# Altium PCB absenc-27.PcbDoc
Units mil, origin at the board's own origin, x right, y up, seen from the top; angles counter-clockwise.
Board outline 1500 x 1500 mil, 4 copper layers (Top Layer, GND, 3V3, Bottom Layer), stack 23.756 mil thick; 57 components, 37 nets, 202 pads, 49 vias.
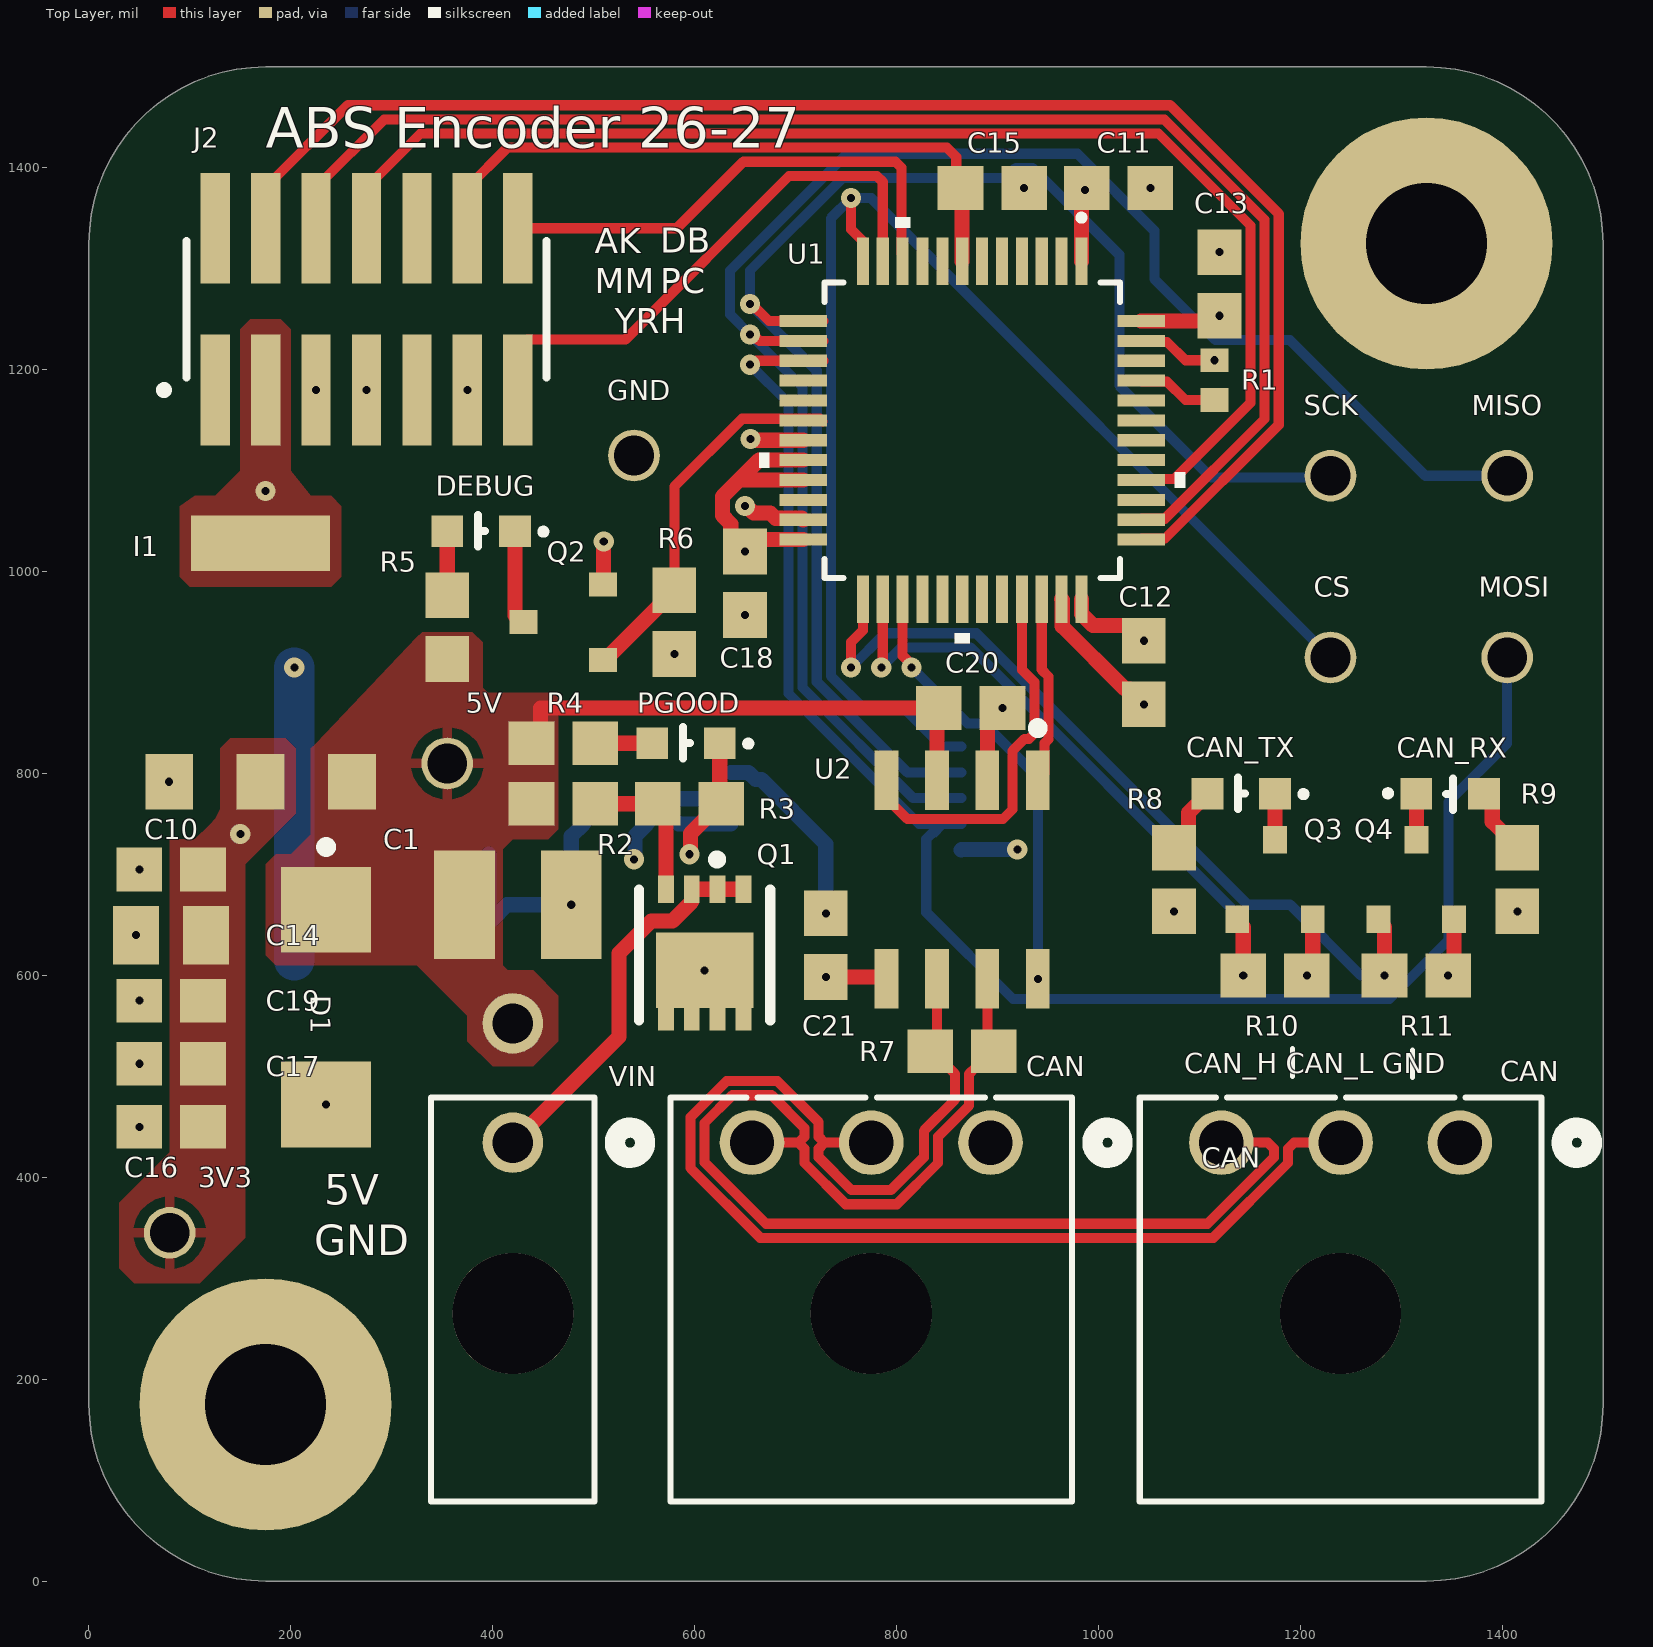
[diagram p0: Top Layer view]
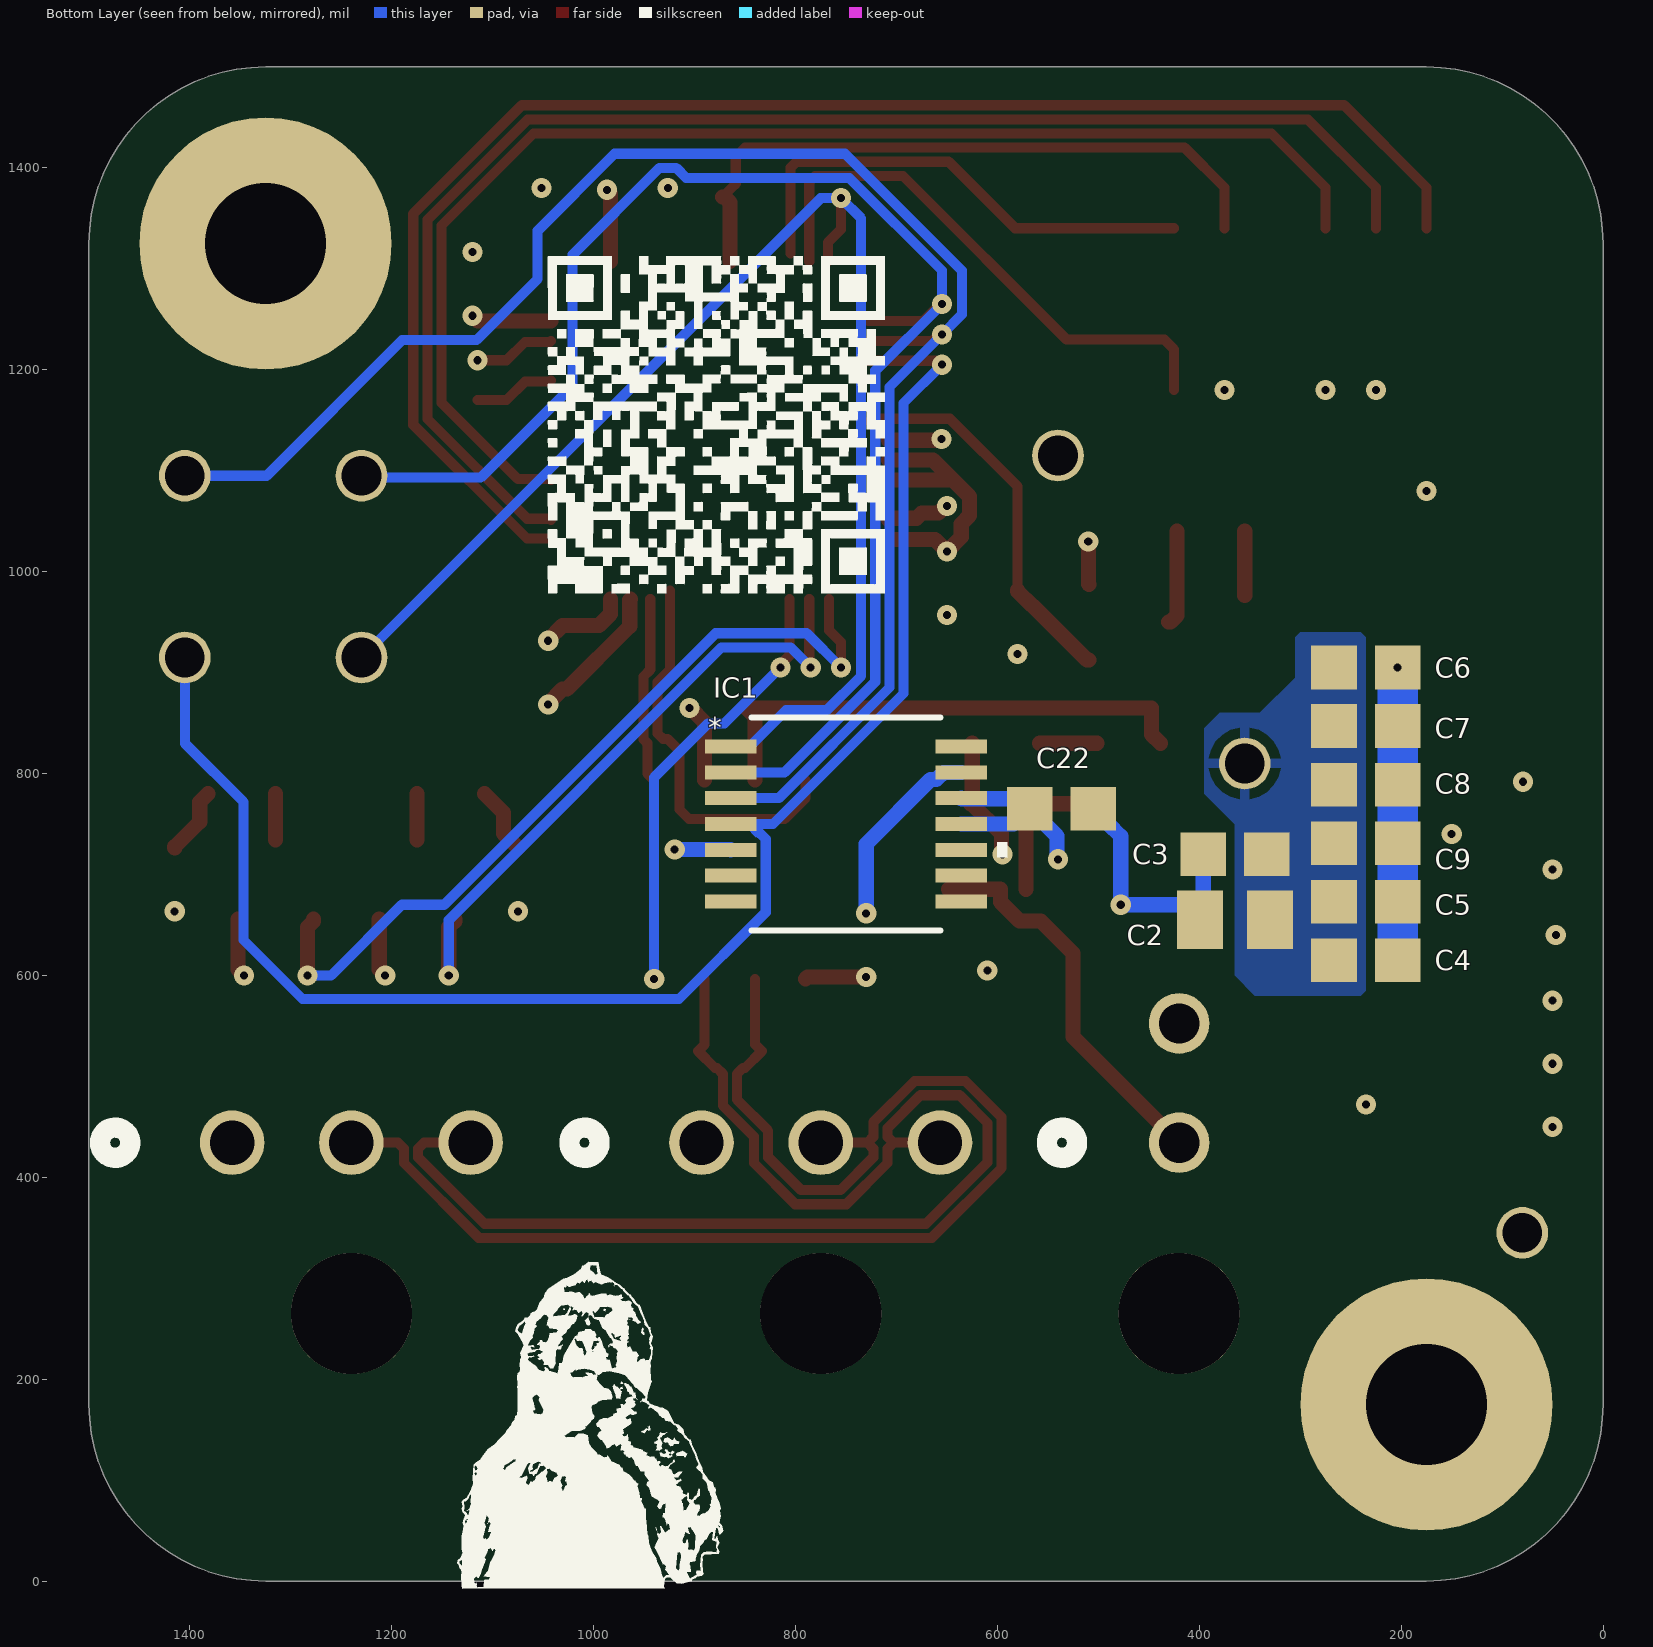
[diagram p1: Bottom Layer view, seen from below]
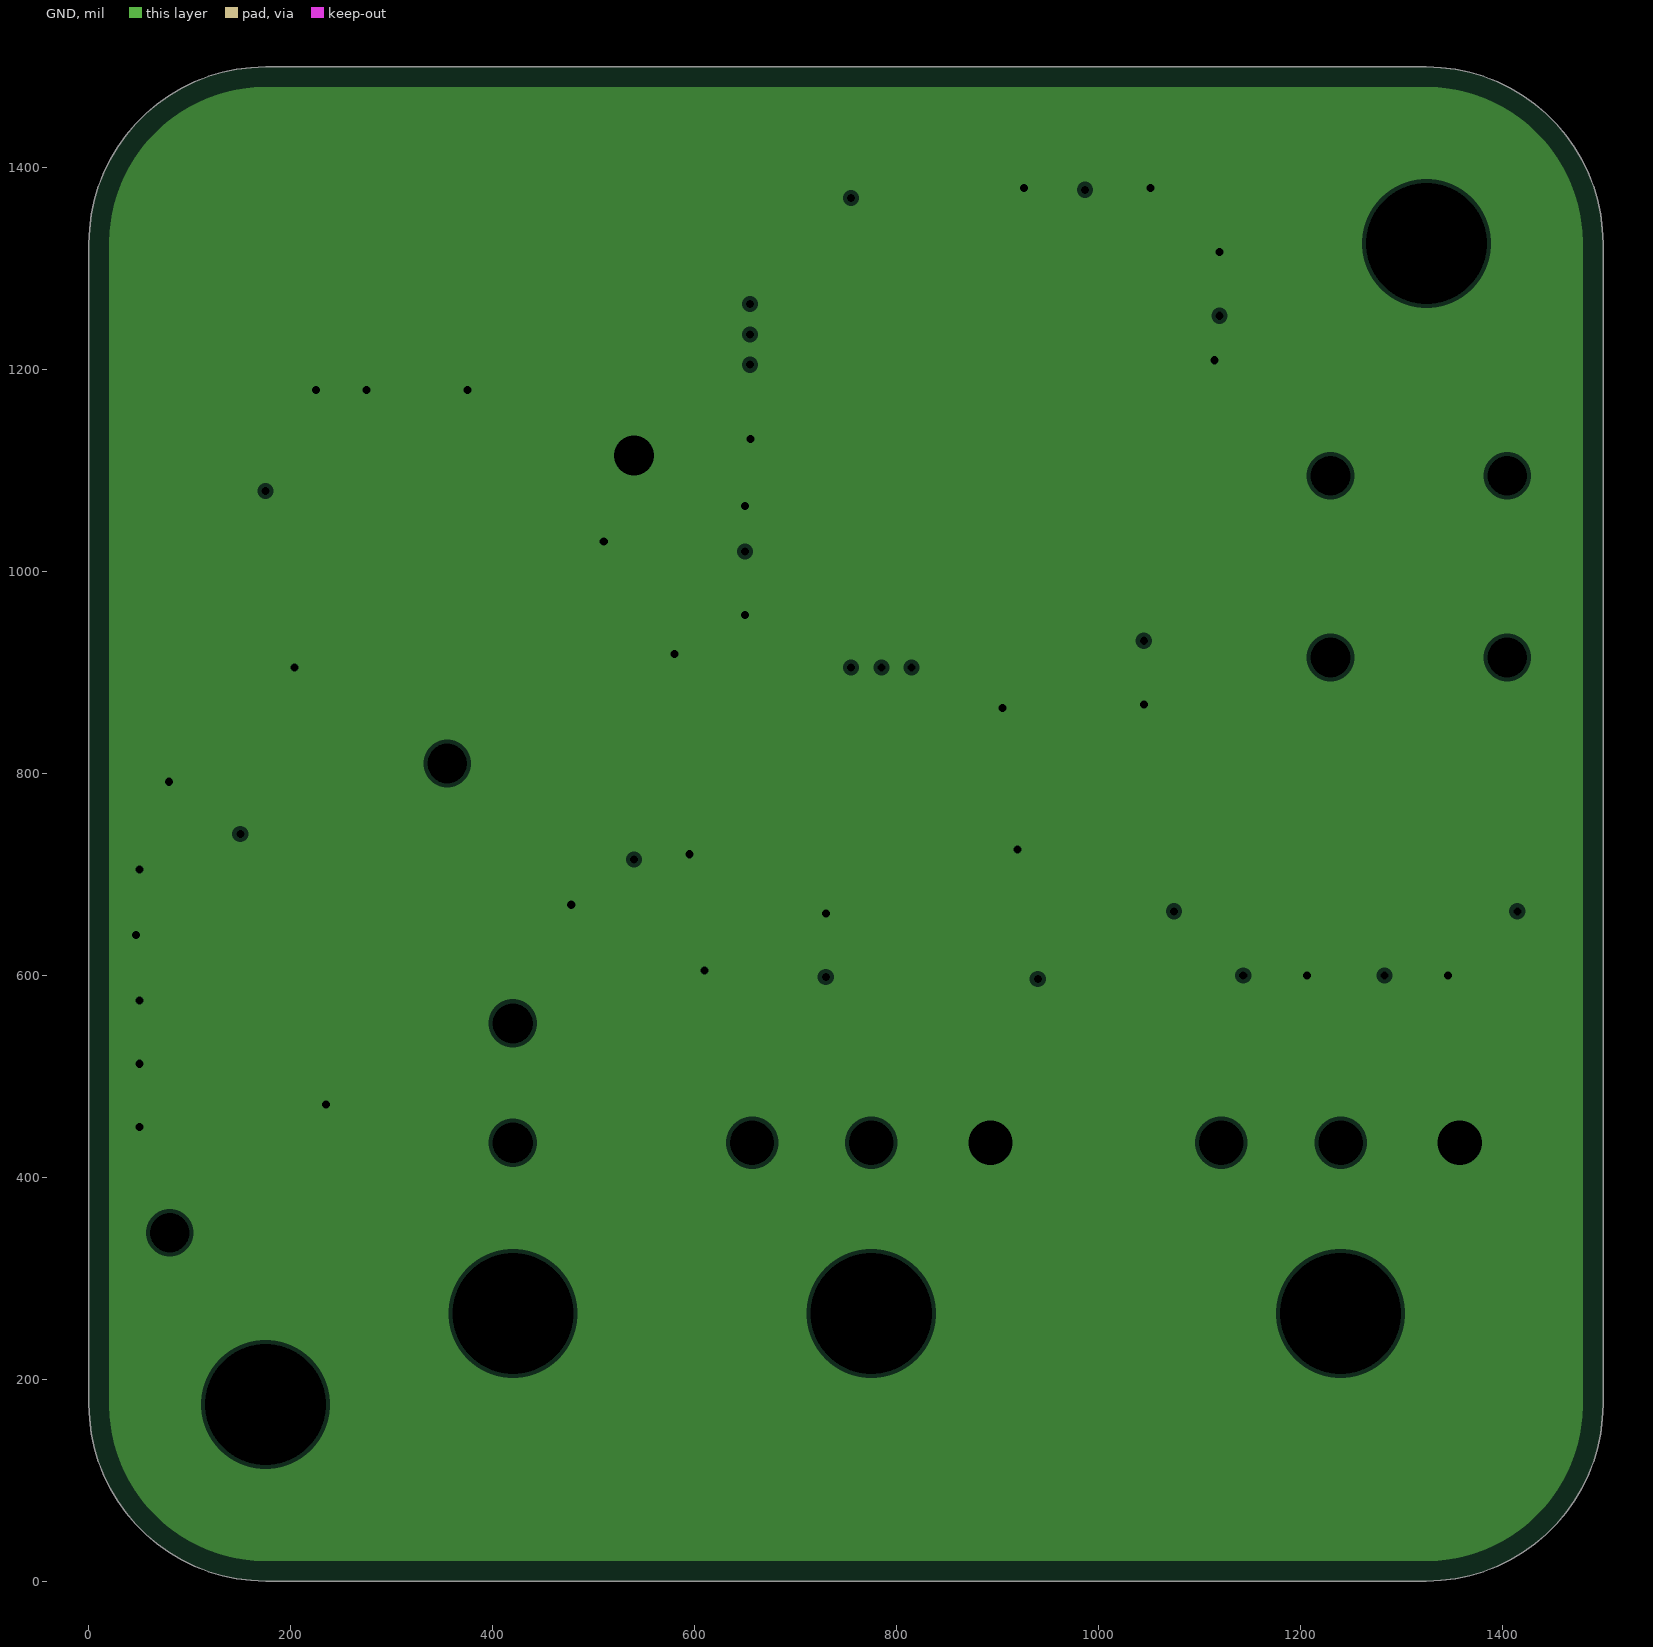
[diagram p2: GND, clearances drawn from the general rule]
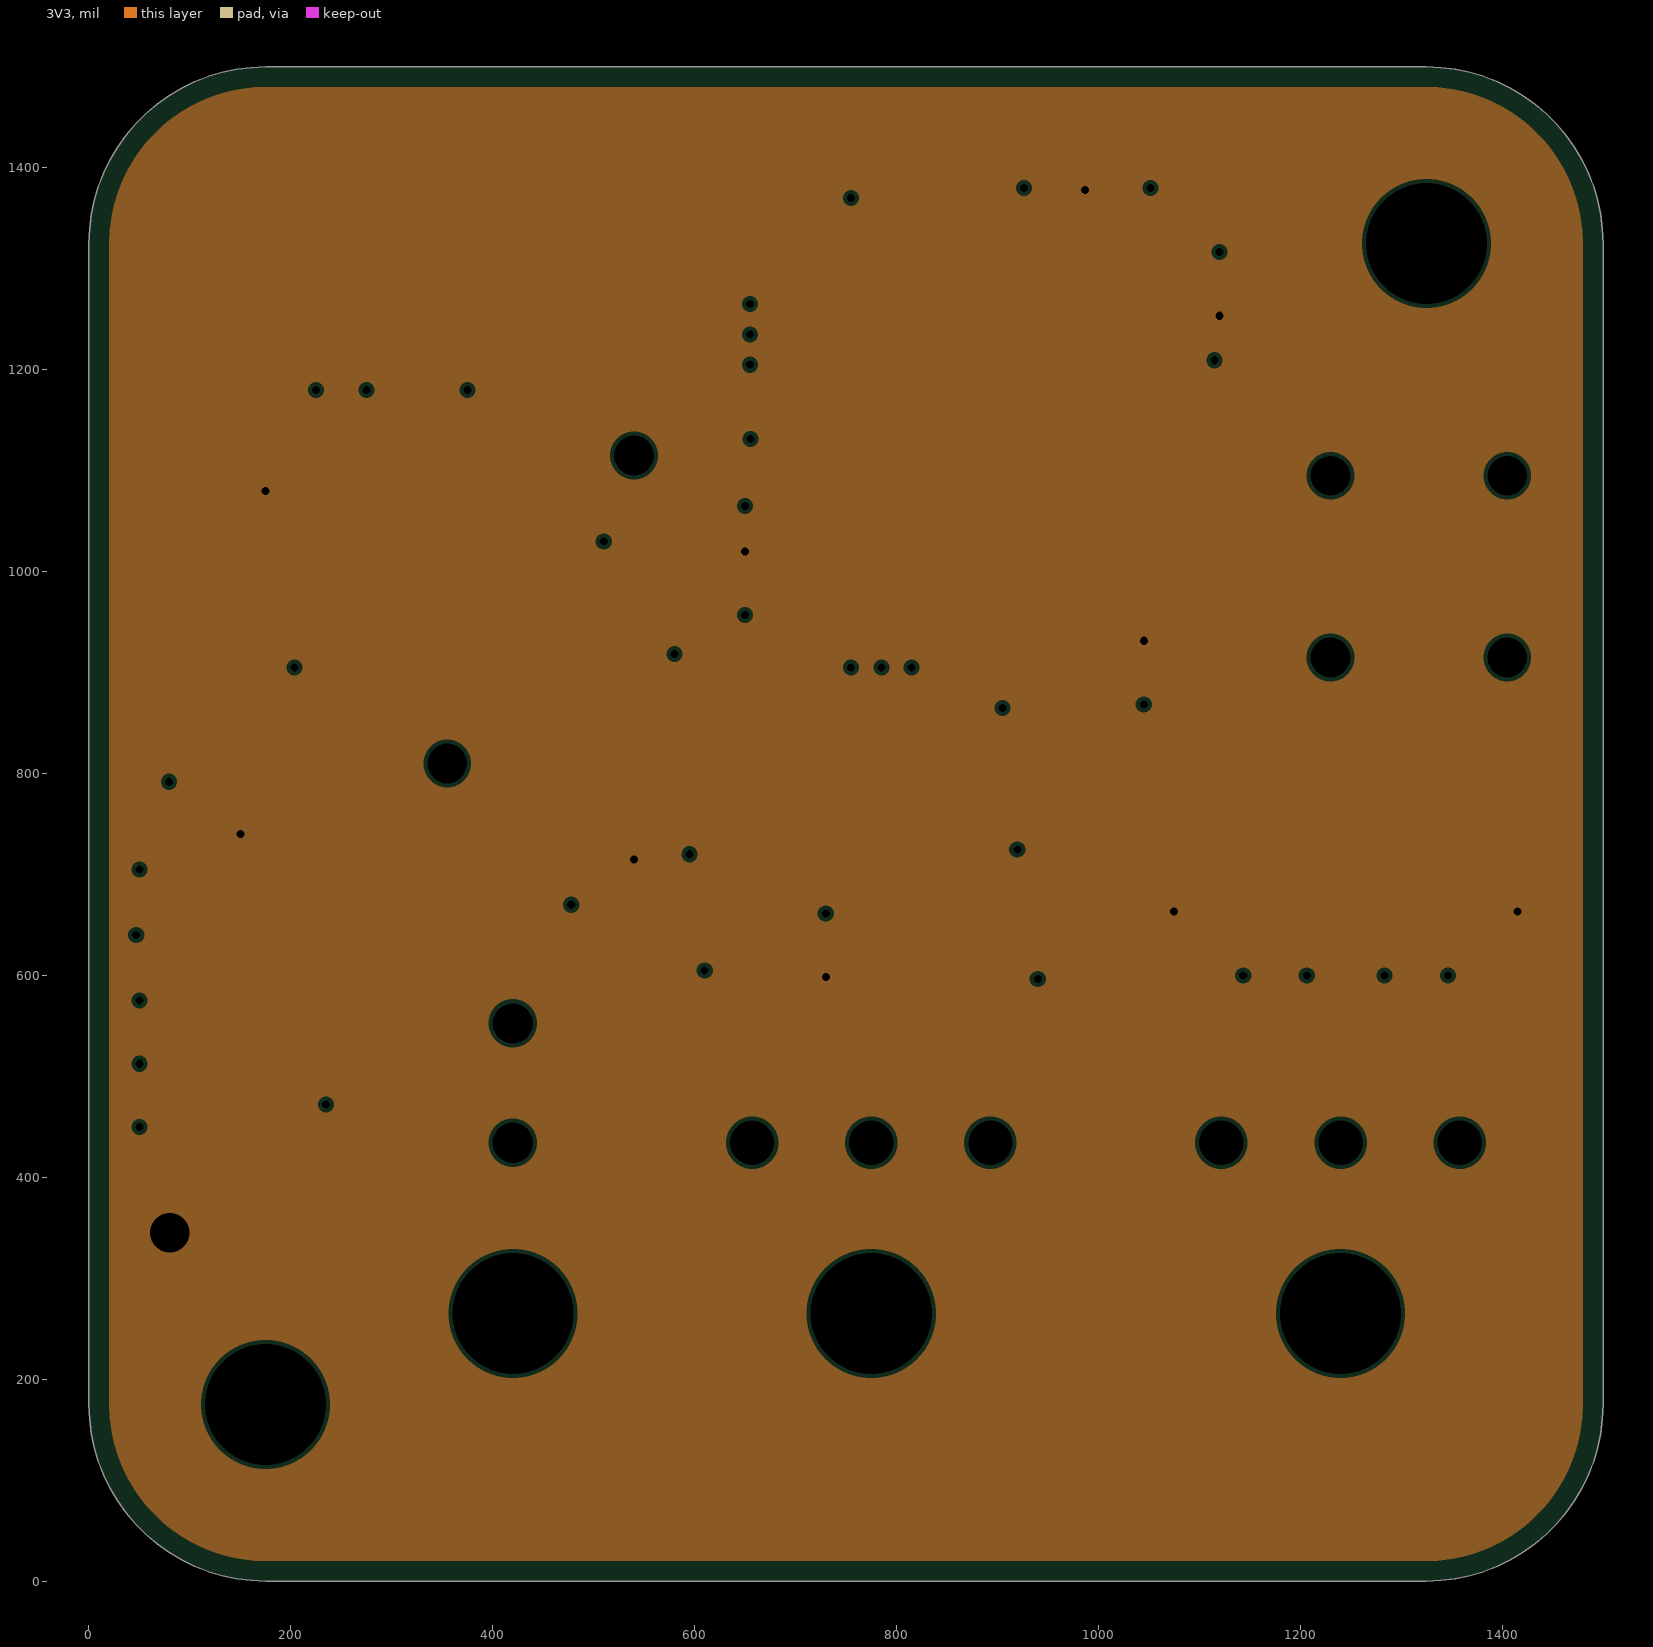
[diagram p3: 3V3, clearances drawn from the general rule]
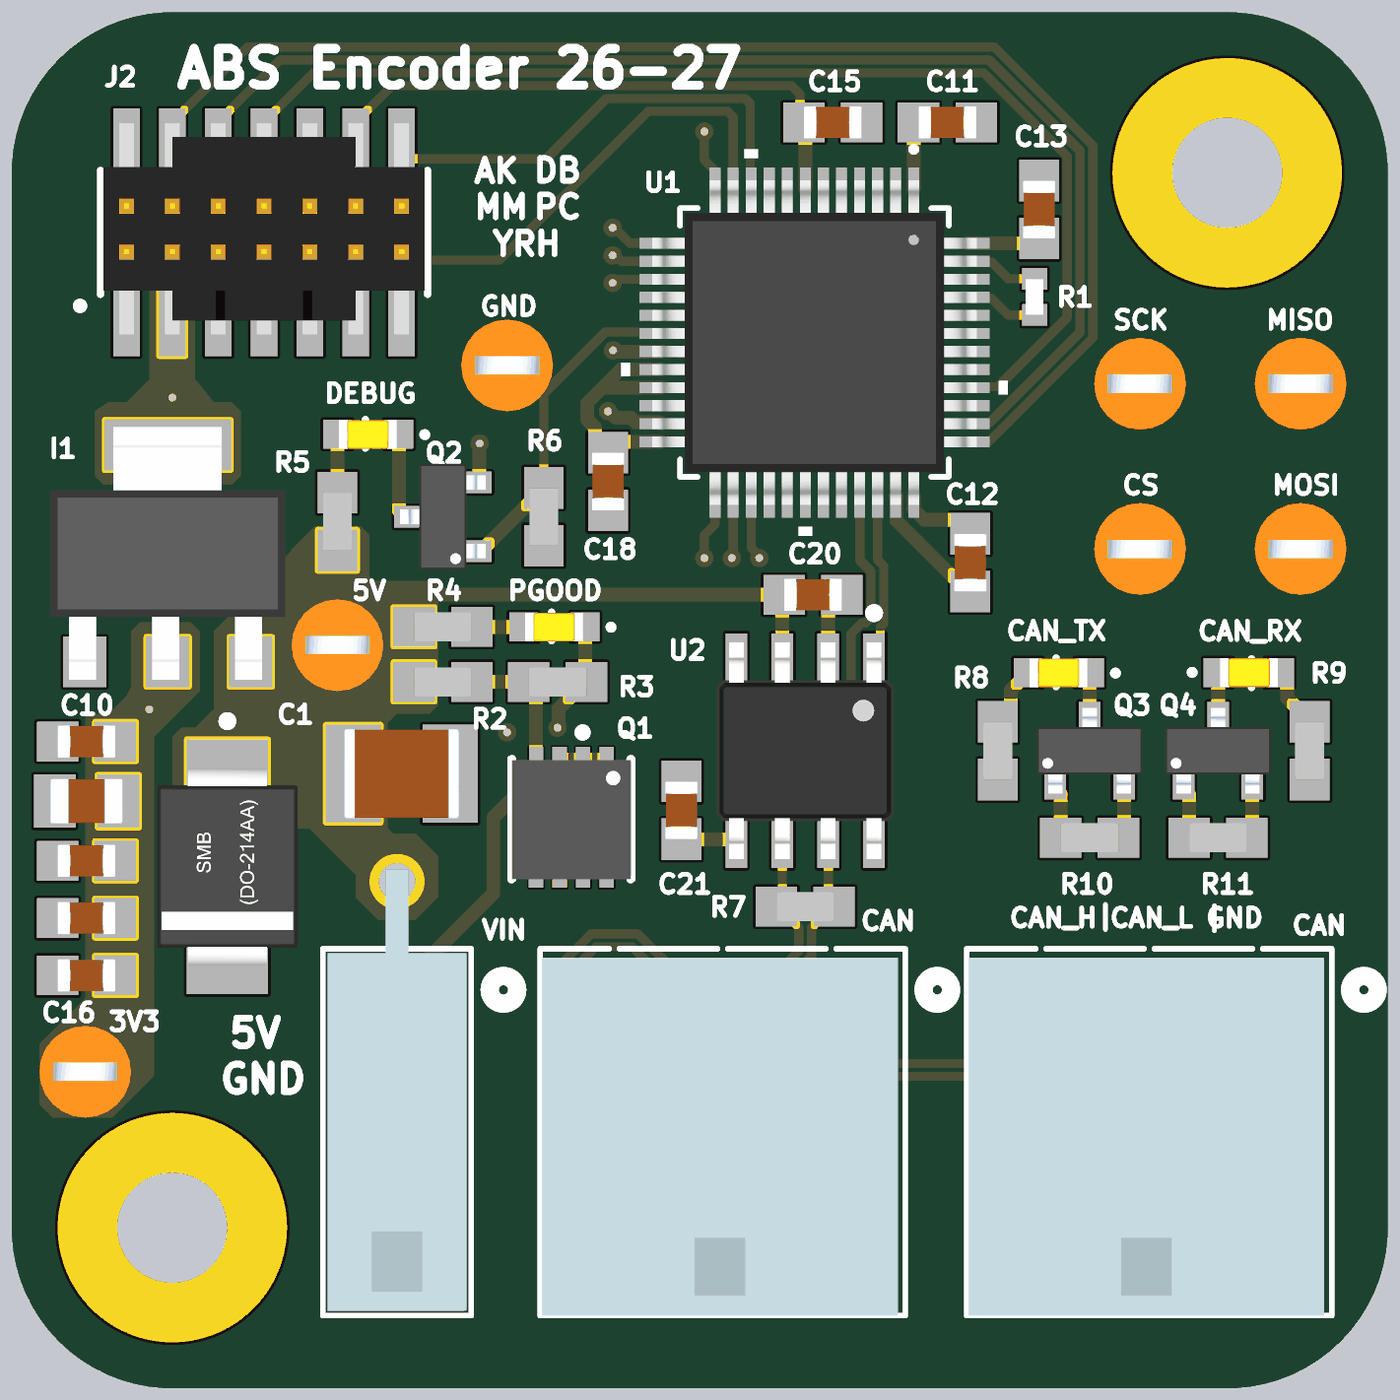
[diagram p4: 3D render of the assembled board from above, using the file's embedded part models]
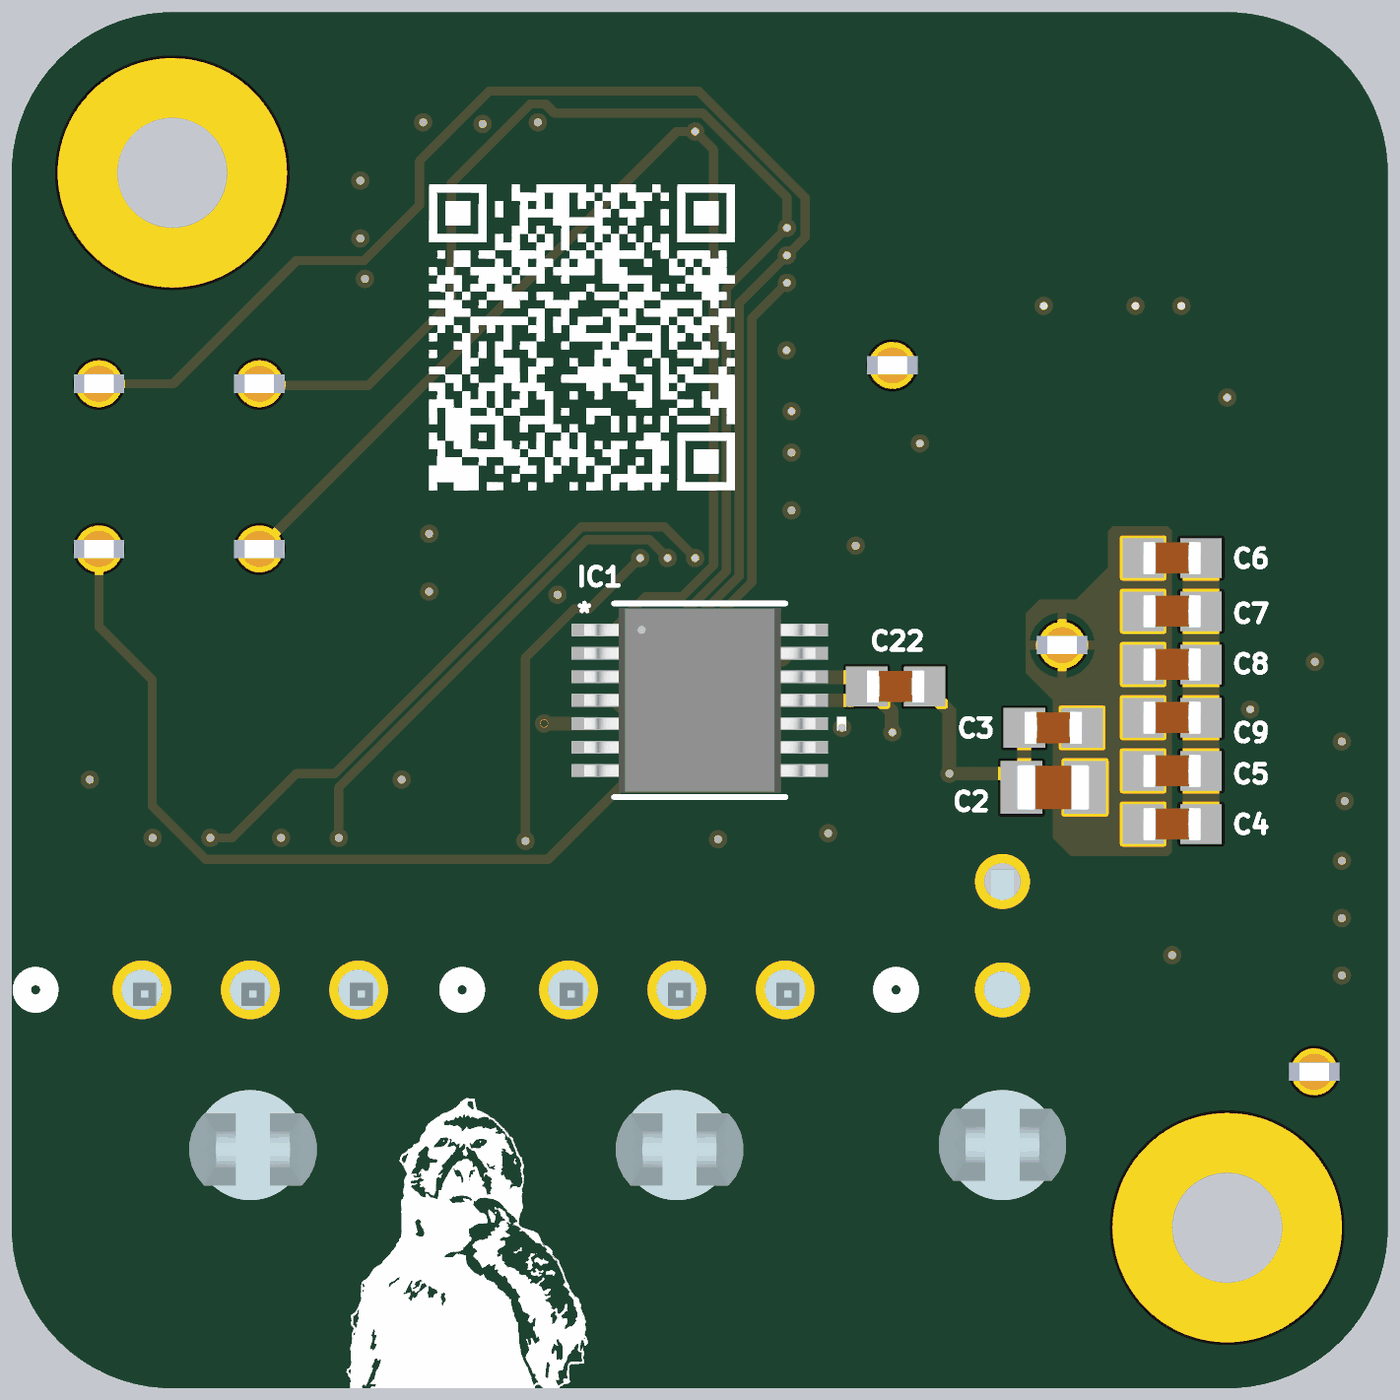
[diagram p5: 3D render of the assembled board from below, using the file's embedded part models]

## Layer stack, top to bottom
Top Solder: solder mask 0.4, Solder Resist, Dk 3.5
Top Layer: signal copper 1.4
Dielectric 2: prepreg 2.8, PP-006, Dk 4.1
GND: plane copper 1.378, net GND
Dielectric 1: dielectric 12.6, FR-4, Dk 4.8
3V3: plane copper 1.378, net 3V3
Dielectric 3: prepreg 2.8, PP-006, Dk 4.1
Bottom Layer: signal copper 1.4
Bottom Solder: solder mask 0.4, Solder Resist, Dk 3.5

## Board outline
0,175 0,1325 cw(c175,1325) 175,1500 1325,1500 cw(c1325,1325) 1500,1325 1500,175 cw(c1325,175) 1325,0 175,0 cw(c175,175)

## Design rules (kind name [scope] priority, off if disabled: settings)
BoardOutlineClearance [All] p1: gap=7.87 ignorepadtopadclearanceinfootprint=FALSE
Clearance [All] p1: gap=4 ignorepadtopadclearanceinfootprint=FALSE except(5: Arc-Via Track-Via SMDPad-Via THPad-Via Via-Via Via-Fill Via-Poly Via-Region Via-Text; 9.84: Arc-Hole Track-Hole SMDPad-Hole THPad-Hole Via-Hole Fill-Hole Poly-Hole Region-Hole Text-Hole)
ComponentClearance [All] p1: gap=4 collisioncheckmode=3 verticalgap=4 showdistances=TRUE
DiffPairsRouting [All] p1: maxlimit=4 minlimit=4 mostfreqgap=4 toplayer_minwidth=4 toplayer_maxwidth=71497.94 toplayer_prefwidth=4 bottomlayer_minwidth=4 bottomlayer_maxwidth=71497.94 bottomlayer_prefwidth=4 maxuncoupledlength=500
Height [All] p1: minheight=0 maxheight=71497.94 prefheight=500
HoleSize [All] p1: absolutevalues=TRUE maxlimit=248.03 minlimit=7.87 maxpercent=80.000 minpercent=20.000
HoleToHoleClearance [All] p1: gap=9.84 allowstackedmicrovias=FALSE
MinimumAnnularRing [All] p1: minimumring=3
MinimumSolderMaskSliver [All] p1: minsoldermaskwidth=0
PlaneClearance [All] p1: clearance=4
PlaneConnect PlaneConnectPowerPads [InPadClass('PowerPads')] p1: planeconnectstyle=Direct reliefexpansion=20 reliefentries=4 reliefconductorwidth=10 reliefairgap=10
PlaneConnect [All] p2: pad.planeconnectstyle=Relief pad.reliefexpansion=11.81 pad.reliefentries=4 pad.reliefconductorwidth=4 pad.reliefairgap=4 via.planeconnectstyle=Direct via.reliefexpansion=11.81 via.reliefentries=4 via.reliefconductorwidth=5 via.reliefairgap=5
PolygonConnect PolygonConnectPowerPads [All vs (InPadClass('PowerPads'))] p1: connectstyle=Direct reliefconductorwidth=10 reliefentries=4 polygonreliefangle="90 Angle" airgapwidth=10
PolygonConnect [All] p2: connectstyle=Direct reliefconductorwidth=4 reliefentries=4 polygonreliefangle="90 Angle" airgapwidth=4
RoutingVias [All] p1: holewidth=7.87 width=17.72 viastyle="Through Hole" minholewidth=7.87 minwidth=17.72 maxholewidth=248.03 maxwidth=257.87
SilkToSilkClearance [All] p1: silktosilkclearance=0
SilkToSolderMaskClearance [IsPad] p1: minsilkscreentomaskgap=4 clearancetoexposedcopper=TRUE
SolderMaskExpansion [All] p1: expansion=2.95 istentingtop=FALSE
SupplyNets "Schematic Supply Nets_3" [InNet('3V3')] p1: voltage=0.000
SupplyNets "Schematic Supply Nets_2" [InNet('GND')] p2: voltage=0.000
SupplyNets "Schematic Supply Nets" [InNet('5V')] p3: voltage=0.000
Width [All] p1: maxlimit=71497.94 minlimit=4 preferedwidth=4
20 further rules are at their usual default settings.

## Classes and differential pairs
component class MCU: C11 C12 C13 C14 C15 C16 C17 C18 C19 DEBUG J2 PGOOD Q2 R1 R4 R5 R6 U1
component class "Input Power": 3V3 5V C1 C2 C3 C4 C5 C6 C7 C8 C9 C10 D1 GND IC1 Q1 R2 R3 VIN
component class Encoder: C22 CS IC1 MISO MOSI SCK
component class CAN: C20 C21 CAN CAN_RX CAN_TX Q3 Q4 R7 R8 R9 R10 R11 U2
differential pair CAN: +CAN_H -CAN_L

## Components (designator, comment, footprint, x,y, rotation, side; value= is the part's Value field where it differs from the comment)
3V3 "5003" TEST-POINT-0001 80,345 r0 top
5V "5003" TEST-POINT-0001 355,810 r0 top
C1 "CAP 1210" CAP-1210 425,670 r0 top
C2 "CAP 0805" CAP-0805 364.65,655 r0 bottom
C3 "CAP 0603" CAP-0603 364.65,720 r0 bottom
C4 "CAP 0603" CAP-0603 235,615 r180 bottom
C5 "CAP 0603" CAP-0603 235,673 r180 bottom
C6 "CAP 0603" CAP-0603 235,905 r180 bottom
C7 "CAP 0603" CAP-0603 235,847 r180 bottom
C8 "CAP 0603" CAP-0603 235,789 r180 bottom
C9 "CAP 0603" CAP-0603 235,731 r180 bottom
C10 "CAP 0603" CAP-0603 81.5,705 r180 top
C11 "CC0603KRX7R0BB104" CAP-0603 1020,1380 r180 top
C12 "CC0603KRX7R0BB104" CAP-0603 1045,900 r90 top
C13 "CC0603KRX7R0BB104" CAP-0603 1120,1285 r270 top
C14 "CAP 0805" CAP-0805 81.5,640 r0 top
C15 "CAP 0603" CAP-0603 895,1380 r0 top
C16 "CAP 0603" CAP-0603 81.5,450 r0 top
C17 "CAP 0603" CAP-0603 81.5,512.5 r0 top
C18 "CC0603KRX7R0BB104" CAP-0603 650,988.5 r90 top
C19 "CAP 0603" CAP-0603 81.5,575 r0 top
C20 "CAP 0603" CAP-0603 873.5,865 r0 top
C21 "CAP 0603" CAP-0603 730,630 r90 top
C22 "CAP 0603" CAP-0603 536.5,765 r180 bottom
CAN "2157601003" CONN_2157600003-SD_03_PEG_MOL 1358.11,434.29 r0 top (schematic designator J4)
CAN "2157601003" CONN_2157600003-SD_03_PEG_MOL 893.11,434.29 r0 top (schematic designator J3)
CAN_RX "BL-HKC36G-AV-TRB" LED-0603 1291.81,750.42 r0 top (schematic designator D5)
CAN_TX "BL-HKC36G-AV-TRB" LED-0603 1198.19,809.58 r180 top (schematic designator D4)
CS "5003" TEST-POINT-0001 1230,915 r0 top
D1 "SMBJ40CA" "DO-214AA (SMBJ)" 235,567.2 r90 top
DEBUG "BL-HKC36G-AV-TRB" LED-0603 445.19,1069.58 r180 top (schematic designator D3)
GND "5003" TEST-POINT-0001 540,1115 r0 top
I1 "LM1117IMPX-3.3/NOPB" IC-SOT-223-4 170,910 r90 top
IC1 "AS5047D-ATSM" TSSOP14_AMS 750,750 r180 bottom
J2 "FTSH-107-01-L-DV-K" SAMTEC_FTSH-107-01-L-DV-K 275,1260 r0 top
MISO "5003" TEST-POINT-0001 1405,1095 r0 top
MOSI "5003" TEST-POINT-0001 1405,915 r0 top
PGOOD "BL-HKC36G-AV-TRB" LED-0603 648.2,859.58 r180 top (schematic designator D2)
Q1 "CSD18543Q3AT" IC-8VSONCLIP 682.32,719.84 r180 top
Q2 "T2N7002AK,LM" IC-SOT23-3 470,950 r90 top
Q3 "T2N7002AK,LM" IC-SOT23-3 1175,695 r0 top
Q4 "T2N7002AK,LM" IC-SOT23-3 1315,695 r0 top
R1 "RES 0402" RES-0402 1115,1189.68 r90 top
R2 "RES 0603" RES-0603 470,770 r0 top
R3 "RES 0603" RES-0603 595,770 r0 top
R4 "RES 0603" RES-0603 470,830 r0 top
R5 "RES 0603" RES-0603 355,945 r90 top
R6 "RES 0603" RES-0603 580,950 r90 top
R7 "RES 0603" RES-0603 865,525 r0 top
R8 "RES 0603" RES-0603 1075,695 r90 top
R9 "RES 0603" RES-0603 1415,695 r90 top
R10 "RES 0603" RES-0603 1175,600 r0 top
R11 "RES 0603" RES-0603 1315,600 r0 top
SCK "5003" TEST-POINT-0001 1230,1095 r0 top
U1 "STM32G431CBT6" IC-LQFP48 875,1140 r270 top
U2 "TCAN1044VDRQ1" IC-8SOIC 865,695 r180 top
VIN "2125280200" CONN_2125280000_02_MOL 420,434.29 r0 top (schematic designator J1)

## Footprints (in the part's own frame and the unit in brackets; to place one, negate y for a bottom-side part, rotate by r counter-clockwise, add the part's x,y. Pads: shape width x height; smd on the part's side, far side on the other; paste and mask are expansions set on the pad)
CAP-0603 [mm]
  rect 1.15x1.1 smd: 1(-0.8,0) 2(0.8,0)
  body extent -0.8,-0.45 0.8,0.45, height 0.8
CAP-0805 [mm]
  rect 1.16x1.47 smd: 1(-0.88,0) 2(0.88,0)
  body extent -1,-0.63 1,0.63, height 0.94
CAP-1210 [mm]
  rect 1.53x2.72 smd: 1(-1.341,0) 2(1.341,0)
  body extent -1.6,-1.25 1.6,1.25, height 2.7
CONN_2125280000_02_MOL [mil]
  round 60 hole 40 paste-99999 mask+0: 1(0,0) 2(0,118.11)
  round 120 hole 120 unplated paste-99999 mask+0: 3(0,-169.29)
  silkscreen extent -81,-355 131,45, body extent -76,-350 76,131, height 325
CONN_2157600003-SD_03_PEG_MOL [mil]
  round 64 hole 44 paste-99999 mask+0: 1(0,0) 2(-118.11,0) 3(-236.22,0)
  round 120 hole 120 unplated paste-99999 mask+0: 4(-118.11,-169.29)
  silkscreen extent -317,-355 131,45, body extent -315,-355 73,35, height 210
"DO-214AA (SMBJ)" [mm]
  rect 2.16x2.26 smd: 1(-2.416,0) 2(2.484,0)
  silkscreen extent 3.94,-0.13 4.19,0.12, body extent -2.72,-1.95 2.78,1.95, height 2.45
IC-8SOIC [mm]
  rect 0.6x1.5 smd: 1(-1.905,-2.5) 2(-0.635,-2.5) 3(0.635,-2.5) 4(1.905,-2.5) 5(1.905,2.5) 6(0.635,2.5) 7(-0.635,2.5) 8(-1.905,2.5)
  silkscreen extent -2.03,-3.93 -1.78,-3.69, body extent -2.45,-3 2.45,3, height 1.75
IC-8VSONCLIP [mm]
  rect 0.4x0.7 smd paste-100 mask+0.05: 1(2.812,0.877) 2(0.862,0.877) 2(1.512,0.877) 2(2.162,0.877) 3(0.862,4.077) 3(1.512,4.077) 3(2.162,4.077) 3(2.812,4.077)
  rect 2.45x1.9 smd paste-100 mask+0.05: 3(1.837,2.917)
  silkscreen extent 0.19,0.03 3.49,4.18, body extent 0.18,0.89 3.48,4.19, height 1.1
IC-LQFP48 [mil]
  rect 47x12 smd paste+0 mask+0: 1(-167.32,108.27) 2(-167.32,88.58) 3(-167.32,68.9) 4(-167.32,49.21) 5(-167.32,29.53) 6(-167.32,9.84) 7(-167.32,-9.84) 8(-167.32,-29.53) 9(-167.32,-49.21) 10(-167.32,-68.9) 11(-167.32,-88.58) 12(-167.32,-108.27) 25(167.32,-108.27) 26(167.32,-88.58) 27(167.32,-68.9) 28(167.32,-49.21) 29(167.32,-29.53) 30(167.32,-9.84) 31(167.32,9.84) 32(167.32,29.53) 33(167.32,49.21) 34(167.32,68.9) 35(167.32,88.58) 36(167.32,108.27)
  rect 12x47 smd paste+0 mask+0: 13(-108.27,-167.32) 14(-88.58,-167.32) 15(-68.9,-167.32) 16(-49.21,-167.32) 17(-29.53,-167.32) 18(-9.84,-167.32) 19(9.84,-167.32) 20(29.53,-167.32) 21(49.21,-167.32) 22(68.9,-167.32) 23(88.58,-167.32) 24(108.27,-167.32) 37(108.27,167.32) 38(88.58,167.32) 39(68.9,167.32) 40(49.21,167.32) 41(29.53,167.32) 42(9.84,167.32) 43(-9.84,167.32) 44(-29.53,167.32) 45(-49.21,167.32) 46(-68.9,167.32) 47(-88.58,167.32) 48(-108.27,167.32)
  silkscreen extent -214,-211 211,211, body extent -177,-177 177,177, height 63
IC-SOT23-3 [mm]
  rect 0.6x0.7 smd: 1(-0.95,-1) 2(0.95,-1) 3(0,1)
  body extent -1.46,-1.18 1.46,1.19, height 1.12
IC-SOT-223-4 [mm]
  rect 1.4x1.2 smd mask+0.07: 1(-3,2.3) 3(-3,-2.3) 4(-3,0)
  rect 1.4x3.5 smd: 2(3,0)
  body extent -3.5,-3.25 3.5,3.25, height 1.68
LED-0603 [mm]
  rect 0.8x0.8 smd: 1(2.291,0.751) 2(0.589,0.751)
  silkscreen extent -0.2,0.34 1.52,1.13, body extent 0.65,0.36 2.25,1.16, height 0.39
RES-0402 [mm]
  rect 0.6x0.7 smd: 1(-0.5,0) 2(0.5,0)
  body extent -0.5,-0.25 0.5,0.25, height 0.3
RES-0603 [mm]
  rect 1.15x1.1 smd: 1(-0.8,0) 2(0.8,0)
  body extent -0.8,-0.4 0.8,0.4, height 0.43
SAMTEC_FTSH-107-01-L-DV-K [mm]
  rect 0.74x2.79 smd: 01(-3.81,-2.035) 02(-3.81,2.035) 03(-2.54,-2.035) 04(-2.54,2.035) 05(-1.27,-2.035) 06(-1.27,2.035) 07(0,-2.035) 08(0,2.035) 09(1.27,-2.035) 10(1.27,2.035) 11(2.54,-2.035) 12(2.54,2.035) 13(3.81,-2.035) 14(3.81,2.035)
  silkscreen extent -5.19,-2.13 4.53,1.72, body extent -4.44,-2.82 4.44,3.02, height 5.96
TEST-POINT-0001 [mm] "2024 miniature test point"
  round 1.3 hole 1: 1(0,0)
  body extent -1.27,-1.27 1.27,1.27, height 4.57
TSSOP14_AMS [mm]
  rect 1.302x0.355 smd paste+0 mask+0: 1(-2.899,1.95) 2(-2.899,1.3) 3(-2.899,0.65) 4(-2.899,0) 5(-2.899,-0.65) 6(-2.899,-1.3) 7(-2.899,-1.95) 8(2.899,-1.95) 9(2.899,-1.3) 10(2.899,-0.65) 11(2.899,0) 12(2.899,0.65) 13(2.899,1.3) 14(2.899,1.95)
  silkscreen extent -2.37,-2.68 4.06,2.68, body extent -3.2,-2.55 3.2,2.55, height 1.2

## Part data
3V3 5V CS GND MISO MOSI SCK: library part TEST-POINT-0001, "Oranange PC Test Point, Miniature Phoisphor Bronze Silver Plating Through Hole Mounting Type"
C1: Capacitance=100uF, Voltage Rating=16V
C2: Capacitance=10uF, Voltage Rating=50V
C3: Capacitance="1.0 uF", Voltage Rating=50V
C4: Capacitance="100 nF", Voltage Rating=50V
C5 C16: Capacitance="10 nF", Voltage Rating="50 V"
C6: Capacitance="1.0 nF", Voltage Rating=50V
C7: Capacitance="100 pF", Voltage Rating=50V
C8: Capacitance="10 pF", Voltage Rating=50V
C9 C10: Capacitance="10 uF", Voltage Rating=16V
C11 C12 C13 C18: library part CAP-100N-0001, "CAP CER 0.1UF 100V X7R 0603", Capacitance="100 nF", Voltage="100 V", ComponentLink1Description=Datasheet, ComponentLink1URL=https://www.yageo.com/upload/media/product/app/datasheet/mlcc/upy-np0x7r_mv_100-to-630v.pdf, Device Class=Ceramic, Size=0603
C14: Capacitance="4.7 uF", Voltage Rating="50 V"
C15: Capacitance="100 nF", Voltage Rating="100 V"
C17 C19: Capacitance="1.0 uF", Voltage Rating="50 V"
C20 C21: Capacitance="100 nF", Voltage Rating=16V
C22: Capacitance=100nF, Voltage Rating=16V
CAN CAN: library part "CONN MF+ 3 PIN Right Angle", "Micro-Fit+ Right-Angle Header, Through Hole, 3.00mm Pitch, Single Row, 3  Circuits, Matte Tin (Sn) Plating, Glow-Wire Capable, Black", Manufacturer_Name=Molex, Copyright="Copyright (C) 2026 Ultra Librarian. All rights reserved.", Datasheet=https://www.molex.com/en-us/products/part-detail-pdf/2157601003?display=pdf, Manufacturer_Part_Number=2157601003, RefDes=RefDes, Type=Type
CAN_RX CAN_TX DEBUG PGOOD: library part LED-0001, "LED YELLOW CLEAR 0603 SMD", Forward Current=30mA, Forward Voltage=2V, ComponentLink1Description=Datasheet, ComponentLink1URL=https://www.americanbrightled.com/pdffiles/led-components/smt/BL-HKC36G-AV-TRB.pdf
D1: library part DIO-TVS-0001, "TVS DIODE 40VWM 64.5VC DO214AA", Current Rating=9.3A, Voltage Rating=64.5V, ComponentLink1Description=Datasheet, ComponentLink1URL=https://www.littelfuse.com/media?resourcetype=datasheets&itemid=09a6ae9a-73cb-4ac4-acac-e6dab92ab953&filename=littelfuse_tvs_diode_smbj_datasheet.pdf
I1: library part IC_LDO_3V3_0001, "IC REG LIN 3.3V 800MA SOT223-4", ComponentLink1Description="New link", ComponentLink1URL=https://www.ti.com/lit/ds/symlink/lm1117.pdf?HQS=dis-dk-null-digikeymode-dsf-pf-null-wwe&ts=1721700739746
IC1: "Description", Manufacturer_Name="ams OSRAM", Copyright="Copyright (C) 2026 Ultra Librarian. All rights reserved.", Manufacturer_Part_Number=AS5047D-ATSM, RefDes=RefDes, Type=Type
J2: library part CONN_Flashing-0001, "Connector Header Surface Mount 14 position 0.050\" (1.27mm)", Package=None, Availability=Unavailable, ComponentLink1Description=Datasheet, ComponentLink1URL=https://mm.digikey.com/Volume0/opasdata/d220001/medias/docus/6209/ftsh-1xx-xx-xxx-dv-xxx-xxx-x-xx-mkt.pdf, MF=Samtec, MP=FTSH-107-01-L-DV-K, Price=None
Q1: library part NMOS-60A-0001, "MOSFET N-CH 60V 12A/60A 8VSON", Continuous Current=60A, Voltage=60V, ComponentLink2Description=Datasheet, ComponentLink2URL=http://www.ti.com/lit/ds/symlink/csd18543q3a.pdf
Q2 Q3 Q4: library part NMOS-200MA-0001, "MOSFET N-CH 60V 200MA SOT23", Continuous Current=200mA, Voltage=60V, ComponentLink1Description=Datasheet, ComponentLink1URL=https://toshiba.semicon-storage.com/info/T2N7002AK_datasheet_en_20150401.pdf?did=29712&prodName=T2N7002AK
R1: Resistance=0Ω, Wattage=62.5mW
R2 R3: Resistance="150k Ω", Wattage=100mW
R4 R5 R6: Resistance="1kOhm +/-1%", Wattage=1/10W
R7: Resistance=120Ω, Wattage=1/2W
R8 R9: Resistance=100Ω, Wattage=1/16W
R10 R11: Resistance=80.6Ω, Wattage=1/16W
U1: library part IC-STM32G431CBT6, "IC MCU 32BIT 128KB FLASH 48LQFP", Package=48LQFP, ComponentLink1Description=Datasheet, ComponentLink1URL=https://www.st.com/resource/en/datasheet/stm32g431cb.pdf
U2: library part IC-CAN-0001, "IC TRANSCEIVER 1/1 8SOIC", ComponentLink1Description=Datasheet, ComponentLink1URL=https://www.ti.com/lit/ds/symlink/tcan1044-q1.pdf?HQS=dis-dk-null-digikeymode-dsf-pf-null-wwe&ts=1728758303289&ref_url=https%253A%252F%252Fwww.ti.com%252Fgeneral%252Fdocs%252Fsuppproductinfo.tsp%253FdistId%253D10%2526gotoUrl%253Dhttps%253A%252F%252Fwww.ti.com%252Flit%252Fgpn%252Ftcan1044-q1
VIN: library part "CONN MF+ 2 PIN Stacked Right Angle", "Micro-Fit+ Right-Angle Header, Through Hole, 3.00mm Pitch, Dual Row, 2 Circuits, 1.52Âµm Matte Tin (Sn) Plating, Glow-Wire Capable, Black", Manufacturer_Name=Molex, Copyright="Copyright (C) 2026 Ultra Librarian. All rights reserved.", Datasheet=https://www.molex.com/en-us/products/part-detail-pdf/2125280200?display=pdf, Manufacturer_Part_Number=2125280200, RefDes=RefDes, Type=Type

## Free pads (board coordinates)
  round 250 hole 120: ""(175,175) ""(1325,1325)

## Via types
v1: diameter 20, hole 8, Top Layer to Bottom Layer, tented both sides, 49 vias

## Nets (pads, with @x,y where several pads share a name; then routed paths per layer and width w, separated by ;. In a path a pad name is that pad's centre, name@x,y a point inside that pad or via, vN(x,y) a via of type N, cw(c..) or ccw(c..) an arc to the next point about the centre after c; other vN are vias at no path point)
3V3: 3V3.1 C10.1 C11.2 C12.2 C13.2 C14.2 C16.2 C17.2 C18.2 C19.2 C21.1 C22.1 I1.2 I1.4 IC1.11 IC1.12 J2.03 R8.1 R9.1 U1.1 U1.20 U1.21 U1.24 U1.36 U1.48 U2.5 | length 795.9
  Top Layer w15: U1.24 661.73,1031.73 v1(650,1020) 635.85,1034.15 635.85,1047.33 627.5,1055.68 627.5,1074.32 643.97,1090.79 ; U1.21 643.97,1090.79 ; U1.20 663.65,1110.47 643.97,1090.79 ; v1(730,598.5) 788.07,598.5 U2.5 ; U1.36 983.27,958.18 994.81,946.63 1030.85,946.63 1045,932.48 v1(1045,931.5) ; U1.1 983.27,1374.76 v1(986.74,1378.23) C11.2 ; U1.48 1114.76,1248.27 v1(1120,1253.5)
  Bottom Layer w15: v1(540,715) 540.96,715.96 540.96,737.96 552.85,749.86 552.85,750.85 567.01,765 C22.1 578.07,775.07 635.34,775.07 IC1.12 ; C22.1@568.98,765 583.98,750 IC1.11
  other v1: 1075,663.5 1415,663.5 150,740 175,1080
5V: 5V.1 C1.1 C2.1 C3.1 C4.1 C5.1 C6.1 C7.1 C8.1 C9.1 C20.1 D1.2 I1.3 R2.1 R4.1 R5.1 U2.3 VIN.2 | length 515
  Top Layer w15: R4.1 447.29,838.79 447.29,865 848.5,865 840,856.5 U2.3
A: IC1.7
B: IC1.6
"CAN RX LED": Q4.1 R11.1 U1.25 | length 813.6
  Top Layer w10: v1(755,905) 755,930 766.73,941.73 U1.25
  Top Layer w15: Q4.1 1277.6,653.66 1283.5,647.76 v1(1283.5,600)
  Bottom Layer w10: v1(755,905) 789,939 879.08,939 1148.08,670 1190,670 1260,600 v1(1283.5,600)
"CAN TX LED": Q3.1 R10.1 U1.26 | length 660.1
  Top Layer w10: v1(785,905) 785.41,905 786.42,906.01 U1.26
  Top Layer w15: Q3.1 1137.6,653.66 1143.5,647.76 v1(1143.5,600)
  Bottom Layer w10: v1(785,905) 805,925 873.28,925 1143.5,654.78 v1(1143.5,600)
CAN_H: CAN.3 R7.2 U2.7 | length 1303.4
  Top Layer w10: CAN.3@656.89,434.29 703.09,434.29 ; U2.7 890,531.5 R7.2 879.84,508.35 877.86,508.35 872,502.49 872,471.16 841.08,440.25 841.08,414.11 800.27,373.29 749.73,373.29 708.94,414.08 708.94,428.43 703.09,434.29 ; CAN.3@1121.89,434.29 1168.09,434.29 1173.94,428.43 1173.94,419.88 1108.07,354 670.71,354 609.89,414.82 609.89,453.76 637.42,481.29 676.36,481.29 708.94,448.7 708.94,440.15 703.09,434.29
CAN_L: CAN.2 R7.1 U2.6 | length 1349.7
  Top Layer w10: CAN.2@775,434.29 728.8,434.29 ; U2.6 840,531.5 R7.1 850.16,508.35 852.14,508.35 858,502.49 858,476.96 827.08,446.05 827.08,419.91 794.47,387.29 755.53,387.29 722.94,419.88 722.94,428.43 728.8,434.29 ; CAN.2@1240,434.29 1193.8,434.29 1187.94,428.43 1187.94,414.08 1113.87,340 664.91,340 595.89,409.02 595.89,459.56 631.62,495.29 682.16,495.29 722.94,454.5 722.94,440.15 728.8,434.29
CAN_RX: U1.33 U2.4 | length 389
  Top Layer w10: U2.4 790,775.71 810.81,754.9 905.54,754.9 915,764.36 915,822.49 926.85,834.35 931.37,834.35 936.64,839.62 936.64,890.38 924.46,902.56 U1.33@924.46,981.49
CAN_STB: U1.27 U2.8 | length 441.1
  Top Layer w10: U1.27 806.1,916.6 815,907.71 v1(815,905)
  Bottom Layer w10: v1(815,905) 870.33,849.67 886.59,849.67 940,796.26 v1(940,596.57)
CAN_TX: U1.34 U2.1 | length 186.5
  Top Layer w10: U2.1 946.81,800.24 946.81,829.99 950.64,833.82 950.64,896.18 943.9,902.92 U1.34
DEBUG: Q2.1 R6.2 U1.18 | length 377.1
  Top Layer w10: R6.2@580,982.48 580,1084.26 647.16,1151.42 724.1,1151.42 U1.18@726.68,1148.84
  Top Layer w15: Q2.1 511.34,912.6 565.1,966.36 565.85,966.36 580,980.51 R6.2
GND: C1.2 C2.2 C3.2 C4.2 C5.2 C6.2 C7.2 C8.2 C9.2 C10.2 C11.1 C12.1 C13.1 C14.1 C15.2 C16.1 C17.1 C18.1 C19.1 C20.2 C21.2 C22.2 CAN.1 D1.1 GND.1 I1.1 IC1.5 IC1.13 J2.05 J2.07 J2.11 PGOOD.2 Q1.3 Q2.2 Q3.2 Q4.2 R1.2 R3.2 R6.1 R10.2 R11.2 U1.19 U1.23 U1.35 U1.47 U2.2 | length 1494.5
  Top Layer w10: U1.47 1043.32,1227.58 1068.01,1227.58 1086.22,1209.37 v1(1115,1209.37)
  Top Layer w15: Q2.2 509.69,987.72 509.69,1029.69 v1(510,1030) ; v1(595,720) 595.96,720.96 595.96,740.44 625.51,770 R3.2 625,771.5 PGOOD.2 ; v1(650,1065) 651.35,1065 658.27,1058.09 674.93,1058.09 680.1,1052.92 706.18,1052.92 U1.23 ; v1(655.44,1131.42) 656.79,1131.42 658.06,1130.16 U1.19 ; U2.2 890,850.85 904.15,865 v1(905,865) ; U1.35 964.27,971.99 964.27,945.91 1026.54,883.64 1030.85,883.64 1045,869.49 v1(1045,868.5) ; v1(1206.49,600) 1212.4,605.91 Q3.2 ; v1(1346.49,600) 1352.4,605.91 Q4.2
  Bottom Layer w15: C3.2 396.14,658.15 C2.2 414.29,670 v1(477.8,670) 477.8,737.8 489.86,749.86 489.86,750.85 504.02,765 C22.2 ; IC1.13 653.48,801.18 660.59,794.07 666.26,794.07 730,730.34 v1(730,661.5) ; IC1.5 864.43,724.7 v1(919.7,724.7)
  Bottom Layer w40: C4.2 v1(203.5,905)
  other v1: 50,450 235,472.09 50,512.5 50,575 610,605 46.85,640 50,705 79.45,791.89 580,918.5 650,957.01 225,1179.88 275,1179.88 375,1179.88 1120,1316.5 926.5,1380 1051.5,1380
I: IC1.14
NetD2_1: PGOOD.1 R4.2 | length 56.5
  Top Layer w15: R4.2 PGOOD.1
NetD3_1: DEBUG.1 R5.2 | length 63.5
  Top Layer w15: R5.2 DEBUG.1
NetD3_2: DEBUG.2 Q2.3 | length 94.7
  Top Layer w15: DEBUG.2 422,956.66 428.66,950 Q2.3
NetD4_1: CAN_TX.1 R8.2 | length 67.2
  Top Layer w15: R8.2 1089.15,740.65 1089.15,761.15 CAN_TX.1
NetD4_2: CAN_TX.2 Q3.3 | length 45.6
  Top Layer w15: Q3.3 CAN_TX.2
NetD5_1: CAN_RX.1 R9.2 | length 67.2
  Top Layer w15: CAN_RX.1 1390.25,771.75 1390.25,752.23 1415,727.48 R9.2
NetD5_2: CAN_RX.2 Q4.3 | length 45.6
  Top Layer w15: Q4.3 CAN_RX.2
NetQ1_1: Q1.1 R2.2 R3.1 | length 150.1
  Top Layer w15: R2.2 R3.1 571.61,761.89 Q1.1
NetR1_1: R1.1 U1.45 | length 80.6
  Top Layer w10: U1.45 1043.32,1188.21 1068.01,1188.21 1086.22,1170 R1.1
NRST: C15.1 J2.12 U1.7 | length 658.2
  Top Layer w10: J2.12 375,1380.47 414.53,1420 850,1420 859.2,1410.8 859.2,1384.3 C15.1 C15.1@872.5,1371
  Top Layer w15: U1.7@865,1307.32 865,1365.85 870.16,1371 C15.1@872.5,1371
RevPolDrain: Q1.2 VIN.1 | length 388
  Top Layer w15: VIN.1 525,539.29 525,621.89 557.01,653.9 578.12,653.9 596.83,672.61 596.83,684.94 597.2,685.31 622.79,685.31 Q1.2@648.39,685.31
"SPI CS": CS.1 IC1.1 U1.12 | length 1371.3
  Top Layer w10: v1(755,1370) 755,1339.06 767.98,1326.07 767.73,1325.82 U1.12@767.73,1307.32
  Bottom Layer w10: IC1.1 845.48,826.77 809.52,862.74 768.98,862.74 735,896.72 735,1350 v1(755,1370) 775,1370 CS.1
"SPI MISO": IC1.3 MISO.1 U1.14 | length 1698.9
  Top Layer w10: v1(655,1235) 657.71,1235 664.12,1228.58 U1.14 U1.14@727.68,1228.58
  Bottom Layer w10: IC1.3 816.53,775.59 707,885.12 707,1183 v1(655,1235) 635,1255 635,1298.08 750.92,1414 979.25,1414 1055.43,1337.82 1055.43,1289.78 1115.85,1229.37 1189.55,1229.37 1323.92,1095 MISO.1
"SPI MOSI": IC1.4 MOSI.1 U1.15 | length 1616.4
  Top Layer w10: v1(655,1205) 657.71,1205 661.6,1208.9 U1.15 U1.15@727.68,1208.9
  Bottom Layer w10: v1(655,1205) 693,1167 693,879.32 822.32,750 IC1.4@845.48,750 ; IC1.4 IC1.4@845.48,750 ; MOSI.1 1405,830 1346.95,771.95 1346.95,635.17 1288.36,576.57 915.44,576.57 829.5,662.52 829.5,735.12 834.77,740.39 835.88,740.39 IC1.4@845.48,750
"SPI SCK": IC1.2 SCK.1 U1.13 | length 1516.9
  Top Layer w10: v1(655,1265) 656.89,1265 673.62,1248.27 U1.13 U1.13@727.68,1248.27
  Bottom Layer w10: IC1.2 810.74,801.18 721,890.92 721,1199 v1(655,1265) 655,1298.28 746.72,1390 908.21,1390 918.21,1400 934.78,1400 1020.75,1314.03 1020.75,1184.25 1111.94,1093.06 SCK.1@1231.94,1093.06
SWCLK: J2.06 U1.38 | length 1410.2
  Top Layer w10: J2.06 225,1380.47 292.53,1448 1065.31,1448 1164.65,1348.66 1164.65,1151.21 1065.87,1052.42 1043.32,1052.42 U1.38
SWDIO: J2.04 U1.37 | length 1514.8
  Top Layer w10: J2.04 175,1380.47 256.53,1462 1071.11,1462 1178.65,1354.46 1178.65,1145.41 1065.98,1032.73 1043.32,1032.73 U1.37
SWO: J2.08 U1.40 | length 1291.5
  Top Layer w10: J2.08 275,1380.47 328.53,1434 1059.52,1434 1150.65,1342.86 1150.65,1167.34 1075.11,1091.79 1043.32,1091.79 U1.40
U: IC1.10
"UART TX": J2.14 U1.10 | length 494.5
  Top Layer w10: J2.14 582.38,1340.12 648.27,1406 799.14,1406 805,1400.14 U1.10@805,1315.38
UART_RX: J2.13 U1.11 | length 554.2
  Top Layer w10: J2.13 425,1220.24 434.57,1229.8 531.33,1229.8 693.52,1392 780.56,1392 786.42,1386.14 U1.11
V: IC1.9
W: IC1.8
pads on no net: CAN.4 J2.01 J2.02 J2.09 J2.10 U1.2 U1.3 U1.4 U1.5 U1.6 U1.8 U1.9 U1.16 U1.17 U1.22 U1.28 U1.29 U1.30 U1.31 U1.32 U1.39 U1.41 U1.42 U1.43 U1.44 U1.46 VIN.3

## Polygon pours and split planes (outlines as drawn)
5V on Bottom Layer "5V_L04_P006" (solid, pour order 6): 235,935 235,585 240,580 345,580 365,600 365,750 395,780 395,845 380,860 340,860 305,895 305,935 300,940 240,940
5V on Top Layer "5V_L01_P004" (solid, pour order 4): 225,830 220,825 220,740 200,720 185,720 175,710 175,620 185,610 325,610 375,560 375,535 400,510 440,510 465,535 465,580 440,605 415,605 410,610 410,725 420,735 455,735 465,745 465,875 460,880 395,880 390,885 390,930 380,940 330,940 325,935
3V3 on Top Layer "3V3_L01_P005" (solid, pour order 5): 90,1065 90,995 100,985 240,985 250,995 250,1065 240,1075 220,1075 200,1100 200,1240 190,1250 160,1250 150,1240 150,1100 125,1075 105,1075
3V3 on Top Layer "3V3_L01_P001" (solid, pour order 1): 120,750 105,735 80,735 80,425 30,375 30,310 45,295 110,295 155,340 155,710 205,760 205,825 195,835 140,835 130,825 130,770 130,765 125,755
3V3 on 3V3 (split plane): 1336.06,1479.6 1347.06,1478.42 1357.95,1476.46 1368.67,1473.72 1379.17,1470.23 1389.39,1465.99 1399.28,1461.04 1408.8,1455.39 1417.89,1449.08 1426.5,1442.14 1434.6,1434.6 1442.14,1426.5 1449.08,1417.89 1455.39,1408.8 1461.04,1399.28 1465.99,1389.39 1470.23,1379.17 1473.72,1368.67 1476.46,1357.95 1478.42,1347.06 1479.6,1336.06 1479.97,1325.71 1479.9,1325 1479.9,175 1479.97,174.29 1479.6,163.94 1478.42,152.94 1476.46,142.05 1473.72,131.33 1470.23,120.83 1465.99,110.61 1461.04,100.72 1455.39,91.2 1449.08,82.11 1442.14,73.5 1434.6,65.4 1426.5,57.86 1417.89,50.92 1408.8,44.61 1399.28,38.96 1389.39,34.01 1379.17,29.77 1368.67,26.28 1357.95,23.54 1347.06,21.58 1336.06,20.4 1325.71,20.03 1325,20.1 175,20.1 174.29,20.03 163.94,20.4 152.94,21.58 142.05,23.54 131.33,26.28 120.83,29.77 110.61,34.01 100.72,38.96 91.2,44.61 82.11,50.92 73.5,57.86 65.4,65.4 57.86,73.5 50.92,82.11 44.61,91.2 38.96,100.72 34.01,110.61 29.77,120.83 26.28,131.33 23.54,142.05 21.58,152.94 20.4,163.94 20.03,174.29 20.1,175 20.1,1325 20.03,1325.71 20.4,1336.06 21.58,1347.06 23.54,1357.95 26.28,1368.67 29.77,1379.17 34.01,1389.39 38.96,1399.28 44.61,1408.8 50.92,1417.89 57.86,1426.5 65.4,1434.6 73.5,1442.14 82.11,1449.08 91.2,1455.39 100.72,1461.04 110.61,1465.99 120.83,1470.23 131.33,1473.72 142.05,1476.46 152.94,1478.42 163.94,1479.6 174.29,1479.97 175,1479.9 1325,1479.9 1325.71,1479.97
GND on GND (split plane): 1336.06,1479.6 1347.06,1478.42 1357.95,1476.46 1368.67,1473.72 1379.17,1470.23 1389.39,1465.99 1399.28,1461.04 1408.8,1455.39 1417.89,1449.08 1426.5,1442.14 1434.6,1434.6 1442.14,1426.5 1449.08,1417.89 1455.39,1408.8 1461.04,1399.28 1465.99,1389.39 1470.23,1379.17 1473.72,1368.67 1476.46,1357.95 1478.42,1347.06 1479.6,1336.06 1479.97,1325.71 1479.9,1325 1479.9,175 1479.97,174.29 1479.6,163.94 1478.42,152.94 1476.46,142.05 1473.72,131.33 1470.23,120.83 1465.99,110.61 1461.04,100.72 1455.39,91.2 1449.08,82.11 1442.14,73.5 1434.6,65.4 1426.5,57.86 1417.89,50.92 1408.8,44.61 1399.28,38.96 1389.39,34.01 1379.17,29.77 1368.67,26.28 1357.95,23.54 1347.06,21.58 1336.06,20.4 1325.71,20.03 1325,20.1 175,20.1 174.29,20.03 163.94,20.4 152.94,21.58 142.05,23.54 131.33,26.28 120.83,29.77 110.61,34.01 100.72,38.96 91.2,44.61 82.11,50.92 73.5,57.86 65.4,65.4 57.86,73.5 50.92,82.11 44.61,91.2 38.96,100.72 34.01,110.61 29.77,120.83 26.28,131.33 23.54,142.05 21.58,152.94 20.4,163.94 20.03,174.29 20.1,175 20.1,1325 20.03,1325.71 20.4,1336.06 21.58,1347.06 23.54,1357.95 26.28,1368.67 29.77,1379.17 34.01,1389.39 38.96,1399.28 44.61,1408.8 50.92,1417.89 57.86,1426.5 65.4,1434.6 73.5,1442.14 82.11,1449.08 91.2,1455.39 100.72,1461.04 110.61,1465.99 120.83,1470.23 131.33,1473.72 142.05,1476.46 152.94,1478.42 163.94,1479.6 174.29,1479.97 175,1479.9 1325,1479.9 1325.71,1479.97

## Silkscreen, mask and mechanical layers (free items; w line width, h text height)
Top Overlay:
  lines w5: 1192.22,500 1192.22,527.42 ; 1311.08,498.78 1311.08,526.2
  text "ABS Encoder 26-27" at 175,1420 h40
  text "DB" at 566,1316 h25
  text "AK" at 500.97,1315.3 h25
  text "MM" at 501,1276 h25
  text "PC" at 566,1276 h25
  text "YRH" at 521,1236 h25
  text "CAN_H CAN_L GND" at 1085,503.33 h20
  text "5V" at 233,373 h30
  text "GND" at 223,323 h30
Bottom Overlay:
  drawing of 41 lines, arcs and shapes, not listed

## Text inside footprints (layer, text, board x,y; h text height)
IC1: Bottom Overlay "*" at 886.64,835.74 h20; Bottom 3D Body "*" at 836,797.5 h20